# Altium PCB PCI Express_16765X6890_64PIN_Low profile.PCBDOC (part 5 of 5)
Units mm, origin at the board's own origin, x right, y up, seen from the top; angles counter-clockwise.
Board outline 167.65 x 68.9 mm, 6 copper layers (TopLayer, AGround_Layer, InternalPlane1, Power_Layer, Ground_Layer, BottomLayer), stack 1.141 mm thick; 897 components, 648 nets, 2942 pads, 321 vias.
Unrouted connection lines stored in the file: 1996.
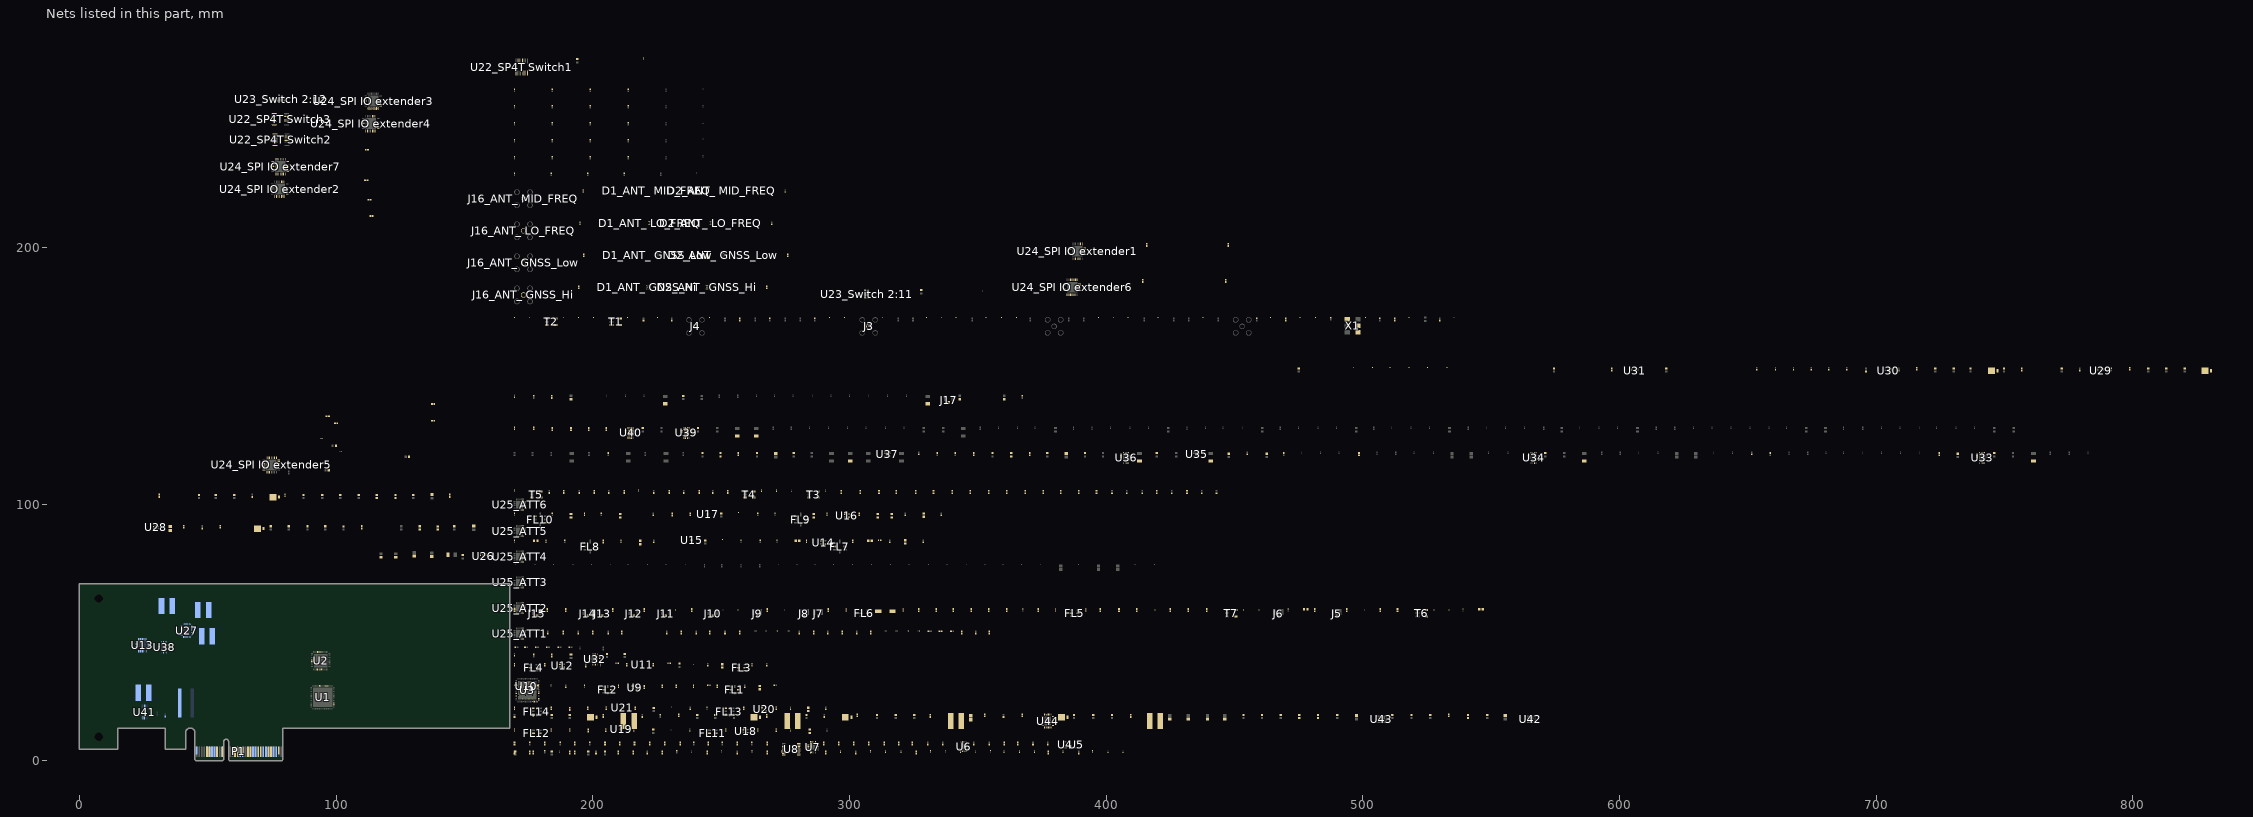
[diagram p6: the nets of this part, all layers, seen from the top]

## Via types
v1: diameter 0.5, hole 0.2, TopLayer to BottomLayer, 309 vias
v2: diameter 0.5, hole 0.2, TopLayer to BottomLayer, tented top, 8 vias
v3: diameter 0.5, hole 0.3, TopLayer to BottomLayer, 4 vias

## Nets (pads, with @x,y where several pads share a name; then routed paths per layer and width w, separated by ;. In a path a pad name is that pad's centre, name@x,y a point inside that pad or via, vN(x,y) a via of type N, cw(c..) or ccw(c..) an arc to the next point about the centre after c; other vN are vias at no path point) (continued)
I2C0_SDA: "R171_SPI IO extender5.1" "U24_SPI IO extender5.9" R42.2 R206.1 U4.2 U7.13 U41.4
I2C1_SCL: "R170_SPI IO extender1.1" "R170_SPI IO extender2.1" "R170_SPI IO extender3.1" "R170_SPI IO extender4.1" "U24_SPI IO extender1.8" "U24_SPI IO extender2.8" "U24_SPI IO extender3.8" "U24_SPI IO extender4.8" R39.2 R40.2 R41.2 U7.3
I2C1_SDA: "R171_SPI IO extender1.1" "R171_SPI IO extender2.1" "R171_SPI IO extender3.1" "R171_SPI IO extender4.1" "U24_SPI IO extender1.9" "U24_SPI IO extender2.9" "U24_SPI IO extender3.9" "U24_SPI IO extender4.9" R36.2 R37.2 R38.2 U7.2
I2C2_SCL: "R170_SPI IO extender6.1" "R170_SPI IO extender7.1" "U24_SPI IO extender6.8" "U24_SPI IO extender7.8" R56.2 R57.2 R58.2 U7.5
I2C2_SDA: "R171_SPI IO extender6.1" "R171_SPI IO extender7.1" "U24_SPI IO extender6.9" "U24_SPI IO extender7.9" R59.2 R60.2 R61.2 U7.4
INA_ALRT: "U24_SPI IO extender5.24" U41.3
JTAG1: P1.B9 U4.9
JTAG2: P1.A5 U5.12
JTAG3: P1.A6 U5.11
JTAG4: P1.A7 U5.10
JTAG5: P1.A8 U5.9
Kom_PG: U32.5
LMK_CLKin0_N: C44.2 U3.32
LMK_CLKin0_P: C45.2 U3.33
LMK_CLKin1_N: C43.2 U3.29
LMK_CLKin1_P: C41.2 U3.30
LMK_CLKsel: "U24_SPI IO extender5.19" U3.34
LMK_OSC_IN_N: C35.1 C37.2 U3.38
LMK_OSC_IN_P: C40.2 C42.2 U3.39
LMK_PG_1.8: "U24_SPI IO extender1.22" U40.5
LMK_PG_3.3: "U24_SPI IO extender1.23" U39.5
LnaInHi: L5.2 U13.19
LnaInLo: L6.2 U13.20
LnaOutHi: C93.1 C94.2 U13.24
LnaOutLo: C96.1 C97.2 U13.23
MaxADC_CLKIN: C62.2 U13.5
MaxCLKOut: R152.1 R160.1 U13.4
MaxCPout: R145.2 TP2.1 U13.1
MaxHIFiltered: C99.2 R146.2 R147.2 R155.1
MaxI0: C90.1 R150.1 R159.1 U13.12
MaxI1: C92.1 R151.1 R161.1 U13.13
MAXIout: "U22_SP4T Switch2.12" C91.2 R142.1
MaxLD: "U24_SPI IO extender7.4" TP1.1 U13.17
MaxLoFiltered: C101.2 R153.2 R154.2 R156.1
MaxQ0: C86.1 R148.1 R158.1 U13.11
MaxQ1: C88.1 R149.1 R157.1 U13.10
MAXQout: "U22_SP4T Switch1.4" C87.2 R140.1
MaxShdn: "U24_SPI IO extender7.3" U13.18
MaxXtal: C60.2 U13.3
MixInHi: C101.1 U13.25
MixInLo: C99.1 U13.26
Net_IOA0: "U24_SPI IO extender7.17" U15.6
Net_IOA1: "U24_SPI IO extender7.18"
Net_IOA3: "U24_SPI IO extender7.20"
Net_IOA4: "U24_SPI IO extender7.21" U15.1
Net_IOA5: "U24_SPI IO extender7.22"
Net_IOB0: "U24_SPI IO extender7.25" U17.6
Net_IOB2: "U24_SPI IO extender7.27" U19.6
Net_IOB3: "U24_SPI IO extender7.28" U10.6
Net_IOB4: "U24_SPI IO extender7.1"
Net_IOB5: "U24_SPI IO extender7.2"
Net_IOC0: "U24_SPI IO extender6.17" U17.1
Net_IOC1: "U24_SPI IO extender6.18" U21.6
Net_IOC2: "U24_SPI IO extender6.19" U11.6
Net_IOC5: "U24_SPI IO extender6.22"
Net_IOC6: "U24_SPI IO extender6.23"
Net_IOD1: "U24_SPI IO extender6.26"
Net_IOD2: "U24_SPI IO extender6.27"
Net_IOD3: "U24_SPI IO extender6.28"
Net_IOD4: "U24_SPI IO extender6.1"
Net_IOD5: "U24_SPI IO extender6.2"
Net_IOD6: "U24_SPI IO extender6.3"
Net_IOD7: "U24_SPI IO extender6.4"
Net_IOE0: "U24_SPI IO extender4.23" R33.1
Net_IOE1: "U24_SPI IO extender4.24" R34.1
Net_IOE2: "U24_SPI IO extender4.3" R35.1
NetC10_1: C10.1 L1.2 R68.1
NetC11_2: C11.2 FL1.2
NetC12_1: C12.1 R69.2
NetC13_1: C13.1 L2.1 R69.1
NetC13_2: C13.2 FL1.6
NetC14_1: C14.1 L1.1 U9.3
NetC15_1: C15.1 FL2.6
NetC15_2: C15.2 U9.1
NetC16_2: C16.2 FL2.2
NetC17_1: C17.1 U10.3
NetC21_1: C21.1 FL3.5
NetC21_2: C21.2 U12.1
NetC22_1: C22.1 L3.2 R70.1
NetC25_1: C25.1 U11.3
NetC25_2: C25.2 FL3.2
NetC26_1: C26.1 L3.1 U12.3
NetC27_2: C27.2 L4.1
NetC28_1: C28.1 FL4.5
NetC29_2: C29.2 R71.1
NetC30_2: C30.2 FL4.2
NetC31_2: C31.2 R72.1
NetC32_2: C32.2 R73.1
NetC33_2: C33.2 U3.5
NetC36_2: C36.2 R76.1
NetC37_1: C37.1 R74.1 R76.2
NetC38_2: C38.2 R75.2 X1.1
NetC39_2: C39.2 R78.1
NetC40_1: C40.1 R78.2 R81.2
NetC60_1: C60.1 T1.1
NetC62_1: C62.1 T2.1
NetC64_1: C64.1 R99.2 R100.1 R103.2
NetC65_1: C65.1 R100.2 R101.1
NetC66_1: C66.1 R104.2 T4.3
NetC66_2: C66.2 R98.1
NetC67_2: C67.2 R102.1 R106.2
NetC68_1: C68.1 R103.1
NetC68_2: C68.2 R107.2
NetC69_2: C69.2 U1.53
NetC70_2: C70.2 U1.54
NetC71_1: C71.1 R104.1 T4.1
NetC71_2: C71.2 R108.1
NetC72_2: C72.2 R107.1 R109.2 R110.1
NetC73_2: C73.2 R110.2 R111.1
NetC74_1: C74.1 U2.15
NetC75_1: C75.1 U2.16
NetC76_2: C76.2 R114.1 R116.2 R118.2
NetC78_2: C78.2 R119.2 R121.1 R123.2
NetC86_2: C86.2 R137.1
NetC87_1: C87.1 T6.3
NetC88_2: C88.2 R139.1
NetC90_2: C90.2 R141.1
NetC91_1: C91.1 T7.3
NetC92_2: C92.2 R144.1
NetC93_2: C93.2 R146.1
NetC94_1: C94.1 FL5.2
NetC95_2: C95.2 R145.1
NetC96_2: C96.2 R153.1
NetC97_1: C97.1 FL6.2
NetC98_2: C98.2 J7.2
NetC100_2: C100.2 J9.2
NetC103_1: C103.1 L7.2 R162.1
NetC104_1: C104.1 L7.1 U14.3
NetC105_1: C105.1 L9.2
NetC105_2: C105.2 U14.1
NetC106_2: C106.2 FL7.2 L8.2
NetC107_2: C107.2 FL7.6 L9.1
NetC108_2: C108.2 R163.2
NetC112_1: C112.1 L10.2
NetC113_1: C113.1 U15.3
NetC113_2: C113.2 L8.1
NetC114_2: C114.2 FL8.2 L10.1
NetC115_1: C115.1 R163.1 U15.5
NetC115_2: C115.2 L11.2
NetC116_2: C116.2 FL8.6 L11.1
NetC118_1: C118.1 L12.2 R164.1
NetC119_1: C119.1 L14.2
NetC119_2: C119.2 U16.1
NetC120_1: C120.1 L12.1 U16.3
NetC121_2: C121.2 FL9.1 L13.2
NetC122_2: C122.2 FL9.5 L14.1
NetC125_1: C125.1 U17.3
NetC125_2: C125.2 L13.1
NetC126_1: C126.1 R165.1
NetC128_2: C128.2 L15.1
NetC129_1: C129.1 C130.2 FL10.5
NetC129_2: C129.2 L16.1 R165.2
NetC131_2: C131.2 FL10.1 L15.2
"NetC132_ANT_ GNSS_Hi_1": "C132_ANT_ GNSS_Hi.1" "J16_ANT_ GNSS_Hi.1"
"NetC132_ANT_ GNSS_Hi_2": "C132_ANT_ GNSS_Hi.2" "D1_ANT_ GNSS_Hi.1"
"NetC132_ANT_ GNSS_Low_1": "C132_ANT_ GNSS_Low.1" "J16_ANT_ GNSS_Low.1"
"NetC132_ANT_ GNSS_Low_2": "C132_ANT_ GNSS_Low.2" "D1_ANT_ GNSS_Low.1"
"NetC132_ANT_ LO_FREQ_1": "C132_ANT_ LO_FREQ.1" "J16_ANT_ LO_FREQ.1"
"NetC132_ANT_ LO_FREQ_2": "C132_ANT_ LO_FREQ.2" "D1_ANT_ LO_FREQ.1"
"NetC132_ANT_ MID_FREQ_1": "C132_ANT_ MID_FREQ.1" "J16_ANT_ MID_FREQ.1"
"NetC132_ANT_ MID_FREQ_2": "C132_ANT_ MID_FREQ.2" "D1_ANT_ MID_FREQ.1"
"NetC133_ANT_ GNSS_Hi_1": "C133_ANT_ GNSS_Hi.1" "D2_ANT_ GNSS_Hi.5"
"NetC133_ANT_ GNSS_Low_1": "C133_ANT_ GNSS_Low.1" "D2_ANT_ GNSS_Low.5"
"NetC133_ANT_ LO_FREQ_1": "C133_ANT_ LO_FREQ.1" "D2_ANT_ LO_FREQ.5"
"NetC133_ANT_ MID_FREQ_1": "C133_ANT_ MID_FREQ.1" "D2_ANT_ MID_FREQ.5"
NetC135_1: C135.1 L17.2 R166.1
NetC136_1: C136.1 L17.1 U18.3
NetC137_1: C137.1 FL11.2
NetC138_1: C138.1 FL11.5
NetC138_2: C138.2 U18.1
NetC141_1: C141.1 U19.3
NetC142_2: C142.2 R167.2
NetC143_2: C143.2 FL12.2
NetC144_1: C144.1 FL12.5
NetC144_2: C144.2 L18.1 R167.1
NetC146_1: C146.1 L19.2 R168.1
NetC147_2: C147.2 FL13.1
NetC148_1: C148.1 FL13.3
NetC148_2: C148.2 U20.1
NetC151_1: C151.1 U21.3
NetC152_1: C152.1 L19.1 U20.3
NetC153_2: C153.2 R169.1
NetC154_2: C154.2 FL14.1
NetC155_1: C155.1 FL14.3
NetC155_2: C155.2 L20.1 R169.2
NetC162_ATT1_2: C162_ATT1.2 U25_ATT1.6 U25_ATT1.7 U25_ATT1.8 U25_ATT1.9
NetC162_ATT2_2: C162_ATT2.2 U25_ATT2.6 U25_ATT2.7 U25_ATT2.8 U25_ATT2.9
NetC162_ATT3_2: C162_ATT3.2 U25_ATT3.6 U25_ATT3.7 U25_ATT3.8 U25_ATT3.9
NetC162_ATT4_2: C162_ATT4.2 U25_ATT4.6 U25_ATT4.7 U25_ATT4.8 U25_ATT4.9
NetC162_ATT5_2: C162_ATT5.2 U25_ATT5.6 U25_ATT5.7 U25_ATT5.8 U25_ATT5.9
NetC162_ATT6_2: C162_ATT6.2 U25_ATT6.6 U25_ATT6.7 U25_ATT6.8 U25_ATT6.9
NetC163_ATT1_2: C163_ATT1.2 U25_ATT1.10
NetC163_ATT2_2: C163_ATT2.2 U25_ATT2.10
NetC163_ATT3_2: C163_ATT3.2 U25_ATT3.10
NetC163_ATT4_2: C163_ATT4.2 U25_ATT4.10
NetC163_ATT5_2: C163_ATT5.2 U25_ATT5.10
NetC163_ATT6_2: C163_ATT6.2 U25_ATT6.10
NetC164_ATT1_2: C164_ATT1.2 U25_ATT1.11
NetC164_ATT2_2: C164_ATT2.2 U25_ATT2.11
NetC164_ATT3_2: C164_ATT3.2 U25_ATT3.11
NetC164_ATT4_2: C164_ATT4.2 U25_ATT4.11
NetC164_ATT5_2: C164_ATT5.2 U25_ATT5.11
NetC164_ATT6_2: C164_ATT6.2 U25_ATT6.11
NetC165_ATT1_2: C165_ATT1.2 U25_ATT1.13
NetC165_ATT2_2: C165_ATT2.2 U25_ATT2.13
NetC165_ATT3_2: C165_ATT3.2 U25_ATT3.13
NetC165_ATT4_2: C165_ATT4.2 U25_ATT4.13
NetC165_ATT5_2: C165_ATT5.2 U25_ATT5.13
NetC165_ATT6_2: C165_ATT6.2 U25_ATT6.13
NetC166_1: C166.1 C167.1 C168.1 C169.1 C180.2 C399.1 C400.1 C401.1 C402.1 C407.2 L23.1 L28.1 R204.2 U27.9 U27.11 U27.26 U27.28 U41.8 U41.9 U44.9 U44.11 U44.26 U44.28
NetC170_1: C170.1 R172.1 R174.2 U26.3
NetC179_1: C179.1 R173.1 R175.1 U27.20
NetC180_1: C180.1 U27.25
NetC181_1: C181.1 R176.1 R178.1 U27.22
NetC186_1: C186.1 R177.1 R179.2 U28.3
NetC189_2: C189.2 U27.12 U27.13 U27.14 U27.15
NetC191_1: C191.1 R180.1 R182.1 U27.21
NetC197_1: C197.1 R183.1 R184.1 U27.19
NetC201_1: C201.1 U30.3 U30.7
  other v2: 704.748,151.999
NetC202_1: C202.1 C203.1 C204.1 C205.1 C206.1 C207.1 C210.2 C211.2 C212.2 C213.2 C214.2 C215.2 FB24.2 U13.2 U13.6 U13.14 U13.22 U13.27 U13.28
NetC209_2: C209.2 FB24.1 U31.1
NetC220_1: C220.1 U32.7
NetC259_2: C259.2 FB25.1 R187.2 U33.10 U33.11 U33.12 U33.13 U33.14
NetC270_1: C270.1 U33.7
NetC279_2: C279.2 FB26.1 R189.2 U34.10 U34.11 U34.12 U34.13 U34.14
NetC293_1: C293.1 U34.7
NetC295_2: C295.2 FB27.1 R192.2 U36.10 U36.11 U36.12 U36.13 U36.14
NetC298_1: C298.1 R191.1 R193.2 U35.3
NetC298_2: C298.2 C299.2 C300.2 C301.2 FB28.1 R191.2 U35.1 U35.2
NetC303_1: C303.1 U36.7
NetC305_1: C305.1 R195.1 R196.2 U37.3
NetC305_2: C305.2 C306.2 C307.2 C308.2 FB31.1 R195.2 U37.1 U37.2
NetC310_1: C310.1 U2.6
NetC311_1: C311.1 J17.2 R197.2 U2.5
NetC329_1: C329.1 U38.7
NetC383_2: C383.2 FB58.1 R200.2 U39.10 U39.11 U39.12 U39.13 U39.14
NetC385_2: C385.2 FB59.1 R201.2 U40.10 U40.11 U40.12 U40.13 U40.14
NetC387_1: C387.1 U39.7
NetC387_2: C387.2 R202.1 U39.6 U39.17
  other v1: 235.949,127.2 237.049,127.2 235.949,128.3 237.049,128.3
NetC388_1: C388.1 U40.7
NetC388_2: C388.2 R203.1 U40.6 U40.17
  other v1: 214.199,127.2 215.299,127.2 214.199,128.3 215.299,128.3
NetC390_1: C390.1 R207.1 R208.2 U42.6
NetC393_2: C393.2 U42.1
NetC395_1: C395.1 R209.1 R210.2 U43.6
NetC398_2: C398.2 U43.1
NetC406_1: C406.1 R211.1 R212.1 U44.20
NetC407_1: C407.1 U44.25
NetC408_1: C408.1 R213.1 R214.1 U44.22
NetC412_2: C412.2 U44.12 U44.13 U44.14 U44.15
NetC413_1: C413.1 R215.1 R217.1 U44.21
NetC417_1: C417.1 R218.1 R219.1 U44.19
"NetD1_ANT_ GNSS_Hi_6": "D1_ANT_ GNSS_Hi.6" "D2_ANT_ GNSS_Hi.2"
"NetD1_ANT_ GNSS_Low_6": "D1_ANT_ GNSS_Low.6" "D2_ANT_ GNSS_Low.2"
"NetD1_ANT_ LO_FREQ_6": "D1_ANT_ LO_FREQ.6" "D2_ANT_ LO_FREQ.2"
"NetD1_ANT_ MID_FREQ_6": "D1_ANT_ MID_FREQ.6" "D2_ANT_ MID_FREQ.2"
NetD3_1: D3.1 L22.1 U27.5
NetD3_2: D3.2 U27.6
NetD4_1: D4.1 L24.1 U27.2
NetD4_2: D4.2 U27.1
NetD5_1: D5.1 L25.1 U27.4
NetD5_2: D5.2 U27.3
NetD6_1: D6.1 L26.1 U27.7
NetD6_2: D6.2 U27.8
NetD7_1: D7.1 L27.1 U44.5
NetD7_2: D7.2 U44.6
NetD8_1: D8.1 L29.1 U44.2
NetD8_2: D8.2 U44.1
NetD9_1: D9.1 L30.1 U44.4
NetD9_2: D9.2 U44.3
NetD10_1: D10.1 L31.1 U44.7
NetD10_2: D10.2 U44.8
NetFB1_1: FB1.1 FB3.1 FB5.1 FB6.1 FB7.1 FB8.1 FB12.1 FB14.1 FB15.1 FB18.1 FB19.1 FB20.1 FB21.1 FB22.1 FB23.1
NetFB2_1: FB2.1 FB4.1
NetFB9_1: FB9.1 FB10.1 FB11.1 FB13.1 FB16.1 FB17.1
NetFL5_5: FL5.5 R147.1
NetFL6_5: FL6.5 R154.1
NetJ5_2: J5.2 R140.2
NetJ6_2: J6.2 R142.2
NetJ8_2: J8.2 R155.2
NetJ10_2: J10.2 R156.2
NetJ11_2: J11.2 R157.2
NetJ12_2: J12.2 R158.2
NetJ13_2: J13.2 R159.2
NetJ14_2: J14.2 R160.2
NetJ15_2: J15.2 R161.2
NetL2_2: L2.2 U10.5
NetL4_2: L4.2 U11.5
NetL16_2: L16.2 U17.5
NetL18_2: L18.2 U19.5
NetL20_2: L20.2 U21.5
NetL23_2: L23.2 U27.24
NetL28_2: L28.2 U44.24
NetR1_1: "U24_SPI IO extender5.13" R1.1 R2.1
NetR3_1: "U24_SPI IO extender5.12" R3.1 R4.1
NetR5_1: "U24_SPI IO extender5.11" R5.1 R6.1
NetR7_1: "U24_SPI IO extender4.13" R7.1 R8.1
NetR9_1: "U24_SPI IO extender4.12" R9.1 R10.1
NetR11_1: "U24_SPI IO extender4.11" R11.1 R12.1
NetR17_1: "U24_SPI IO extender3.13" R17.1 R18.1
NetR19_1: "U24_SPI IO extender3.12" R19.1 R20.1
NetR21_1: "U24_SPI IO extender3.11" R21.1 R22.1
NetR23_1: "U24_SPI IO extender2.13" R23.1 R24.1
NetR25_1: "U24_SPI IO extender2.12" R25.1 R26.1
NetR27_1: "U24_SPI IO extender2.11" R27.1 R28.1
NetR31_1: R31.1 U4.8
NetR32_1: R32.1 U5.8
NetR44_1: "U24_SPI IO extender1.13" R44.1 R45.1
NetR46_1: "U24_SPI IO extender1.12" R46.1 R47.1
NetR48_1: "U24_SPI IO extender1.11" R48.1 R49.1
NetR50_2: R50.2 R51.2 U7.15
NetR52_2: R52.2 R53.2 U7.16
NetR54_2: R54.2 R55.2 U7.11
NetR62_2: R62.2 R63.2 U8.14
NetR64_2: R64.2 R65.2 U8.15
NetR66_2: R66.2 R67.2 U8.16
NetR72_2: R72.2 U3.42
  other v1: 172.459,24.15 173.819,24.15 175.179,24.15 176.539,24.15 171.149,25.46 172.459,25.46 173.819,25.46 175.179,25.46 176.539,25.46 177.849,25.46 171.149,26.82 172.459,26.82 173.819,26.82 175.179,26.82 176.539,26.82 177.849,26.82 171.149,28.18 172.459,28.18 173.819,28.18 175.179,28.18 176.539,28.18 177.849,28.18 171.149,29.54 172.459,29.54 173.819,29.54 175.179,29.54 176.539,29.54 177.849,29.54 172.459,30.85 173.819,30.85 175.179,30.85 176.539,30.85
NetR73_2: R73.2 U3.7
NetR98_2: R98.2 R99.1 R102.2
NetR106_1: R106.1 R108.2 R109.1
NetR112_1: R112.1 R114.2 T3.3
NetR116_1: R116.1 R117.1 T3.1
NetR120_1: R120.1 R121.2 T5.1
NetR123_1: R123.1 R124.1 T5.3
NetR125_1: "U24_SPI IO extender7.13" R125.1 R126.1
NetR127_1: "U24_SPI IO extender7.12" R127.1 R128.1
NetR129_1: "U24_SPI IO extender7.11" R129.1 R130.1
NetR131_1: "U24_SPI IO extender6.13" R131.1 R132.1
NetR133_1: "U24_SPI IO extender6.12" R133.1 R134.1
NetR135_1: "U24_SPI IO extender6.11" R135.1 R136.1
NetR137_2: R137.2 R138.1 T6.4
NetR138_2: R138.2 R139.2 T6.5
NetR141_2: R141.2 R143.1 T7.4
NetR143_2: R143.2 R144.2 T7.5
NetR148_2: R148.2
NetR149_2: R149.2
NetR150_2: R150.2
NetR151_2: R151.2
NetR152_2: R152.2
NetR181_2: R181.2 U27.17
NetR185_1: R185.1 R186.2 U32.9
NetR187_1: R187.1 R188.2 U33.9
NetR189_1: R189.1 R190.2 U34.9
NetR192_1: R192.1 R194.2 U36.9
NetR198_1: R198.1 R199.2 U38.9
NetR200_1: R200.1 R202.2 U39.9
NetR201_1: R201.1 R203.2 U40.9
NetR216_2: R216.2 U44.17
NetT1_3: T1.3 T2.3
NetU8_7: U8.7
NetU8_8: U8.8
"NetU24_SPI IO extender1_3": "U24_SPI IO extender1.3"
"NetU24_SPI IO extender1_4": "U24_SPI IO extender1.4"
"NetU24_SPI IO extender1_15": "U24_SPI IO extender1.15"
"NetU24_SPI IO extender1_16": "U24_SPI IO extender1.16"
"NetU24_SPI IO extender1_24": "U24_SPI IO extender1.24"
"NetU24_SPI IO extender2_3": "U24_SPI IO extender2.3"
"NetU24_SPI IO extender2_4": "U24_SPI IO extender2.4"
"NetU24_SPI IO extender2_15": "U24_SPI IO extender2.15"
"NetU24_SPI IO extender2_16": "U24_SPI IO extender2.16"
"NetU24_SPI IO extender2_23": "U24_SPI IO extender2.23"
"NetU24_SPI IO extender2_24": "U24_SPI IO extender2.24"
"NetU24_SPI IO extender3_4": "U24_SPI IO extender3.4"
"NetU24_SPI IO extender3_15": "U24_SPI IO extender3.15"
"NetU24_SPI IO extender3_16": "U24_SPI IO extender3.16"
"NetU24_SPI IO extender4_4": "U24_SPI IO extender4.4"
"NetU24_SPI IO extender4_15": "U24_SPI IO extender4.15"
"NetU24_SPI IO extender4_16": "U24_SPI IO extender4.16"
"NetU24_SPI IO extender5_1": "U24_SPI IO extender5.1"
"NetU24_SPI IO extender5_2": "U24_SPI IO extender5.2"
"NetU24_SPI IO extender5_3": "U24_SPI IO extender5.3"
"NetU24_SPI IO extender5_4": "U24_SPI IO extender5.4"
"NetU24_SPI IO extender5_15": "U24_SPI IO extender5.15"
"NetU24_SPI IO extender5_16": "U24_SPI IO extender5.16"
"NetU24_SPI IO extender5_23": "U24_SPI IO extender5.23"
"NetU24_SPI IO extender5_25": "U24_SPI IO extender5.25"
"NetU24_SPI IO extender5_26": "U24_SPI IO extender5.26"
"NetU24_SPI IO extender5_27": "U24_SPI IO extender5.27"
"NetU24_SPI IO extender5_28": "U24_SPI IO extender5.28"
"NetU24_SPI IO extender6_15": "U24_SPI IO extender6.15"
"NetU24_SPI IO extender6_16": "U24_SPI IO extender6.16"
"NetU24_SPI IO extender7_15": "U24_SPI IO extender7.15"
"NetU24_SPI IO extender7_16": "U24_SPI IO extender7.16"
O1_N: C47.2 C70.1 R105.2
O1_P: C46.2 C69.1 R105.1
O2_N: C49.2 U1.59
O2_P: C48.2 U1.58
O3_N: C59.2 T1.5
O3_P: C58.2 T1.4
O5_N: C63.2 T2.5
O5_P: C61.2 T2.4
O6_N: C51.2 P1.B15
O6_P: C50.2 P1.B14
O8_N: C57.1 R95.1 R96.1 R97.1
O8_P: C56.1 R93.2 R94.2 R95.2
O8P_N: C57.2 J4.1
O8P_P: C56.2 J3.1
O9_N: C53.2 C74.2 R113.1
O9_P: C52.2 C75.2 R113.2
O10_N: C55.2 U2.19
O10_P: C54.2 U2.18
PCA_VCC: "R170_SPI IO extender1.2" "R170_SPI IO extender2.2" "R170_SPI IO extender3.2" "R170_SPI IO extender4.2" "R171_SPI IO extender1.2" "R171_SPI IO extender2.2" "R171_SPI IO extender3.2" "R171_SPI IO extender4.2" "U24_SPI IO extender1.5" "U24_SPI IO extender2.5" "U24_SPI IO extender3.5" "U24_SPI IO extender4.5" C217.2 C218.2 R8.2 R10.2 R12.2 R18.2 R20.2 R22.2 R24.2 R26.2 R28.2 R31.2 R32.2 R36.1 R37.1 R38.1 R39.1 R40.1 R41.1 R42.1 R43.1 R45.2 R47.2 R49.2 R51.1 R53.1 R55.1 R56.1 R57.1 R58.1 R59.1 R60.1 R61.1 R62.1 R64.1 R66.1 R185.2 U4.16 U5.16 U6.14 U8.12 U32.10 U32.11 U32.12 U32.13 U32.14
PER0_N: C3.2 P1.A17
PER0_P: C4.2 P1.A16
PER1_N: C1.2 P1.A22
PER1_P: C2.2 P1.A21
PER2_N: C6.2 P1.A26
PER2_P: C5.2 P1.A25
PER3_N: C8.2 P1.A30
PER3_P: C7.2 P1.A29
PERST#: "U24_SPI IO extender1.14" "U24_SPI IO extender2.14" "U24_SPI IO extender3.14" "U24_SPI IO extender4.14" "U24_SPI IO extender5.14" P1.A11 U7.1 U8.3
PET1_N: P1.B20
PET1_P: P1.B19
PET2_N: P1.B24
PET2_P: P1.B23
PET3_N: P1.B28
PET3_P: P1.B27
PG_LTC2122: "U24_SPI IO extender5.18" U38.5
PRSNT1#: P1.A1
PRSNT2#: P1.B17 P1.B31
Reset: "U24_SPI IO extender5.20" "U24_SPI IO extender6.14" "U24_SPI IO extender7.14"
"RF1_SP4T Switch1": "U22_SP4T Switch1.14" C104.2
"RF1_SP4T Switch2": "U22_SP4T Switch2.14"
"RF1_SP4T Switch3": "U22_SP4T Switch3.14" C142.1 C143.1
"RF1ADG_Switch 2:11": "U23_Switch 2:11.8" C26.2
"RF1ADG_Switch 2:12": "U23_Switch 2:12.8" C29.1 C30.1
"RF2_SP4T Switch1": "U22_SP4T Switch1.12" C120.2
"RF2_SP4T Switch3": "U22_SP4T Switch3.12" C11.1 C12.2
"RF2ADG_Switch 2:11": "U23_Switch 2:11.5" C14.2
"RF2ADG_Switch 2:12": "U23_Switch 2:12.5" C85.2 L5.1
"RF3_SP4T Switch1": "U22_SP4T Switch1.6" C136.2
"RF3_SP4T Switch2": "U22_SP4T Switch2.6"
"RF3_SP4T Switch3": "U22_SP4T Switch3.6" C153.1 C154.1
"RF4_SP4T Switch2": "U22_SP4T Switch2.4" C152.2
"RF4_SP4T Switch3": "U22_SP4T Switch3.4" C89.2 L6.1
"RFC_SP4T Switch1": "U22_SP4T Switch1.1" C79.1
"RFC_SP4T Switch2": "U22_SP4T Switch2.1" C81.2
"RFC_SP4T Switch3": "C133_ANT_ GNSS_Low.2" "U22_SP4T Switch3.1"
"RFCADG_Switch 2:11": "U23_Switch 2:11.4" C82.2
"RFCADG_Switch 2:12": "C133_ANT_ GNSS_Hi.2" "U23_Switch 2:12.4"
SC18_INT: U5.4 U8.9
SCLK: U1.36 U2.45 U3.13 U5.1 U8.11 U13.8
SDA: U1.35 U2.44 U3.11 U5.2 U6.5 U6.12 U8.6 U13.7
SMCLK: P1.B5 R29.1 U4.12
SMDAT: P1.B6 R30.1 U4.11
SPI_MISO: U2.43 U5.3 U6.3 U6.6 U6.8 U6.11 U8.5
TorRF_50Ohm_20: C79.2 T3.5
TorRF_50Ohm_21: C80.1 T3.4
TorRF_50Ohm_22: C82.1 T4.5
TorRF_50Ohm_23: C83.2 T4.4
TorRF_50Ohm_24: C81.1 T5.5
TorRF_50Ohm_25: C84.2 T5.4
V1_1.8V: C181.2 C182.2 C183.2 C184.2 C185.2 C292.2 C294.2 L24.2 R176.2 U34.1 U34.2 U34.3 U34.15 U34.16 U36.1 U36.2 U36.3 U36.15 U36.16
V1_2.5V: C197.2 C198.2 C199.2 C200.2 C328.1 L26.2 R183.2 U38.1 U38.2 U38.3 U38.15 U38.16
V1_2.8V: C175.2 C176.2 C177.2 C179.2 C219.2 C261.2 L22.2 R173.2 U32.1 U32.2 U32.3 U32.4 U32.15 U32.16 U33.1 U33.2 U33.3 U33.15 U33.16
V1_3.9V: C178.2 C190.2 C191.2 C192.2 C193.2 C194.2 C196.2 C208.2 C216.2 L25.2 R180.2 U26.7 U26.8 U28.7 U28.8 U29.6 U30.6 U31.6
V2_2.5V: C297.2 C304.2 C408.2 C409.2 C410.2 C411.2 L29.2 R213.2 U35.7 U35.8 U37.7 U37.8
V2_3.6V: C389.2 C403.2 C404.2 C405.2 C406.2 C413.2 C414.2 C415.2 C416.2 L27.2 L30.2 R211.2 R215.2 U39.1 U39.2 U39.3 U39.15 U39.16 U40.1 U40.2 U40.3 U40.15 U40.16 U42.4
V2_5.5V: C394.2 C417.2 C418.2 C419.2 L31.2 R218.2 U43.4
"Vcc5VHMC_SP4T Switch1": "C156_SP4T Switch1.2" "C157_SP4T Switch1.2" "U22_SP4T Switch1.8" FB14.2
"Vcc5VHMC_SP4T Switch2": "C156_SP4T Switch2.2" "C157_SP4T Switch2.2" "U22_SP4T Switch2.8" FB15.2
"Vcc5VHMC_SP4T Switch3": "C156_SP4T Switch3.2" "C157_SP4T Switch3.2" "U22_SP4T Switch3.8" FB12.2
Vcc_2.5V_SW_1: "C158_Switch 2:11.2" "C158_Switch 2:12.2" "C159_Switch 2:11.2" "C159_Switch 2:12.2" "U23_Switch 2:11.1" "U23_Switch 2:12.1"
Vcc_2.8V: C109.2 C110.2 C123.2 C124.2 FB2.2 U15.2 U17.2
Vcc_2.8V_Exdr_1: "R170_SPI IO extender7.2" "R171_SPI IO extender7.2" "U24_SPI IO extender7.5" FB16.2 R126.2 R128.2 R130.2
Vcc_2.8V_Exdr_2: "R170_SPI IO extender6.2" "R171_SPI IO extender6.2" "U24_SPI IO extender6.5" FB17.2 R132.2 R134.2 R136.2
Vcc_2.8V_LNA_1: C23.2 C24.2 FB9.2 U11.2
Vcc_2.8V_LNA_2: C139.2 C140.2 FB10.2 U19.2
Vcc_2.8V_LNA_3: C18.2 C19.2 FB11.2 U10.2
Vcc_2.8V_LNA_4: C149.2 C150.2 FB13.2 U21.2
Vcc_3.3V_Tor2: FB4.2
Vcc_5V_AMP_1: C102.1 FB18.2 R162.2
Vcc_5V_AMP_2: C117.1 FB19.2 R164.2
Vcc_5V_AMP_3: C134.1 FB20.2 R166.2
Vcc_5V_AMP_4: C9.1 FB21.2 R68.2
Vcc_5V_AMP_5: C145.1 FB22.2 R168.2
Vcc_5V_AMP_6: C20.1 FB23.2 R70.2
Vcc_2122_1.8V: C321.2 FB42.1 FB43.1 R198.2 U38.10 U38.11 U38.12 U38.13 U38.14
Vcm_2122: C77.2 R118.1 R119.1 U2.7
VCXO_OUT_N: C36.1 X1.5
VCXO_OUT_P: C39.1 X1.4
Vsup_2.5V: C195.2 U29.1
Vsup_2.8V: C390.2 C391.2 C392.2 R207.2 U42.5
Vsup_3.3V: C170.2 C171.2 C172.2 C173.2 C186.2 C187.2 C188.2 L21.1 R172.2 R177.2 U26.1 U26.2 U28.1 U28.2
Vsup_5V: C395.2 C396.2 C397.2 R209.2 U43.5
WAKE#: P1.B11 U4.10
pads on no net: "D1_ANT_ GNSS_Hi.3" "D1_ANT_ GNSS_Hi.4" "D1_ANT_ GNSS_Hi.5" "D1_ANT_ GNSS_Hi.7" "D1_ANT_ GNSS_Low.3" "D1_ANT_ GNSS_Low.4" "D1_ANT_ GNSS_Low.5" "D1_ANT_ GNSS_Low.7" "D1_ANT_ LO_FREQ.3" "D1_ANT_ LO_FREQ.4" "D1_ANT_ LO_FREQ.5" "D1_ANT_ LO_FREQ.7" "D1_ANT_ MID_FREQ.3" "D1_ANT_ MID_FREQ.4" "D1_ANT_ MID_FREQ.5" "D1_ANT_ MID_FREQ.7" "D2_ANT_ GNSS_Hi.1" "D2_ANT_ GNSS_Hi.3" "D2_ANT_ GNSS_Hi.4" "D2_ANT_ GNSS_Hi.6" "D2_ANT_ GNSS_Low.1" "D2_ANT_ GNSS_Low.3" "D2_ANT_ GNSS_Low.4" "D2_ANT_ GNSS_Low.6" "D2_ANT_ LO_FREQ.1" "D2_ANT_ LO_FREQ.3" "D2_ANT_ LO_FREQ.4" "D2_ANT_ LO_FREQ.6" "D2_ANT_ MID_FREQ.1" "D2_ANT_ MID_FREQ.3" "D2_ANT_ MID_FREQ.4" "D2_ANT_ MID_FREQ.6" "U22_SP4T Switch1.3" "U22_SP4T Switch1.5" "U22_SP4T Switch1.7" "U22_SP4T Switch1.11" "U22_SP4T Switch1.13" "U22_SP4T Switch1.15" "U22_SP4T Switch1.16" "U22_SP4T Switch2.3" "U22_SP4T Switch2.5" "U22_SP4T Switch2.7" "U22_SP4T Switch2.11" "U22_SP4T Switch2.13" "U22_SP4T Switch2.15" "U22_SP4T Switch2.16" "U22_SP4T Switch3.3" "U22_SP4T Switch3.5" "U22_SP4T Switch3.7" "U22_SP4T Switch3.11" "U22_SP4T Switch3.13" "U22_SP4T Switch3.15" "U22_SP4T Switch3.16" "U23_Switch 2:11.6" "U23_Switch 2:11.7" "U23_Switch 2:11.9" "U23_Switch 2:12.6" "U23_Switch 2:12.7" "U23_Switch 2:12.9" "U24_SPI IO extender1.7" "U24_SPI IO extender1.10" "U24_SPI IO extender2.7" "U24_SPI IO extender2.10" "U24_SPI IO extender3.7" "U24_SPI IO extender3.10" "U24_SPI IO extender4.7" "U24_SPI IO extender4.10" "U24_SPI IO extender5.7" "U24_SPI IO extender5.10" "U24_SPI IO extender6.7" "U24_SPI IO extender6.10" "U24_SPI IO extender7.7" "U24_SPI IO extender7.10" Conn1.1 Conn1.2 Conn2.1 Conn2.2 FL1.3 FL1.4 FL1.5 FL1.7 FL1.8 FL2.3 FL2.4 FL2.5 FL2.7 FL2.8 FL3.3 FL3.4 FL3.6 FL4.3 FL4.4 FL4.6 FL5.3 FL5.4 FL5.6 FL6.3 FL6.4 FL6.6 FL7.3 FL7.4 FL7.5 FL7.7 FL7.8 FL8.3 FL8.4 FL8.5 FL8.7 FL8.8 FL9.3 FL9.4 FL9.6 FL9.7 FL9.8 FL10.3 FL10.4 FL10.6 FL10.7 FL10.8 FL11.3 FL11.4 FL11.6 FL12.3 FL12.4 FL12.6 FL13.4 FL13.5 FL13.6 FL13.7 FL13.8 FL14.4 FL14.5 FL14.6 FL14.7 FL14.8 J1.2 J1.3 J1.4 J1.5 J2.2 J2.3 J2.4 J2.5 P1.A19 P1.A32 P1.B12 P1.B30 T1.2 T2.2 T3.2 T4.2 T5.2 T6.2 T7.2 U1.2 U1.7 U1.8 U1.9 U1.10 U1.11 U1.20 U1.21 U1.26 U1.27 U1.28 U1.29 U1.30 U1.31 U1.32 U1.33 U1.34 U1.38 U1.39 U1.40 U1.41 U1.42 U1.43 U1.44 U1.45 U1.46 U1.47 U1.48 U1.49 U1.50 U1.51 U1.52 U1.55 U1.60 U1.61 U1.62 U1.63 U1.64 U2.8 U2.11 U2.12 U2.13 U2.14 U2.17 U2.20 U2.21 U2.22 U2.23 U2.24 U2.26 U2.27 U2.28 U2.33 U2.34 U2.35 U2.36 U2.37 U2.38 U2.39 U2.40 U2.41 U2.42 U2.47 U2.48 U2.49 U3.1 U3.2 U3.3 U3.14 U3.23 U3.24 U3.35 U3.36 U3.47 U3.48 U3.56 U3.58 U3.59 U3.60 U3.61 U3.62 U3.63 U3.64 U3.65 U4.5 U4.7 U4.14 U4.15 U5.5 U5.7 U5.14 U5.15 U6.9 U6.10 U7.7 U7.8 U7.9 U7.10 U7.14 U10.4 U11.4 U13.21 U19.4 U21.4 U25_ATT1.3 U25_ATT1.5 U25_ATT1.12 U25_ATT1.14 U25_ATT1.16 U25_ATT1.17 U25_ATT1.18 U25_ATT2.3 U25_ATT2.5 U25_ATT2.12 U25_ATT2.14 U25_ATT2.16 U25_ATT2.17 U25_ATT2.18 U25_ATT3.3 U25_ATT3.5 U25_ATT3.12 U25_ATT3.14 U25_ATT3.16 U25_ATT3.17 U25_ATT3.18 U25_ATT4.3 U25_ATT4.5 U25_ATT4.12 U25_ATT4.14 U25_ATT4.16 U25_ATT4.17 U25_ATT4.18 U25_ATT5.3 U25_ATT5.5 U25_ATT5.12 U25_ATT5.14 U25_ATT5.16 U25_ATT5.17 U25_ATT5.18 U25_ATT6.3 U25_ATT6.5 U25_ATT6.12 U25_ATT6.14 U25_ATT6.16 U25_ATT6.17 U25_ATT6.18 U26.6 U26.9 U28.6 U28.9 U29.2 U29.5 U30.2 U30.5 U31.2 U31.5 U32.8 U33.8 U34.8 U35.6 U35.9 U36.8 U37.6 U37.9 U38.8 U39.8 U40.8 U41.1 U41.2 U42.2 U42.7 U43.2 U43.7 X1.2
copper on no net:
  other v1: 91.8,36.8 92.9,36.8 94,36.8 95.1,36.8 96.2,36.8 91.8,37.9 92.9,37.9 94,37.9 95.1,37.9 96.2,37.9 91.8,39 92.9,39 94,39 95.1,39 96.2,39 91.8,40.1 92.9,40.1 94,40.1 95.1,40.1 96.2,40.1 91.8,41.2 92.9,41.2 94,41.2 95.1,41.2 96.2,41.2 157.324,79.249 157.324,80.249 29.825,90.499 29.825,91.499 314.749,119 435.249,119 314.749,120 435.249,120 76.6,229.85 77.7,229.85 78.8,229.85 79.9,229.85 76.6,230.95 77.7,230.95 78.8,230.95 79.9,230.95 76.6,232.05 77.7,232.05 78.8,232.05 79.9,232.05 76.6,233.15 77.7,233.15 78.8,233.15 79.9,233.15 111.85,246.6 112.95,246.6 114.05,246.6 115.15,246.6 111.85,247.7 112.95,247.7 114.05,247.7 115.15,247.7 111.85,248.8 112.95,248.8 114.05,248.8 115.15,248.8 111.85,249.9 112.95,249.9 114.05,249.9 115.15,249.9 112.787,255.35 113.887,255.35 114.987,255.35 116.087,255.35 112.787,256.45 113.887,256.45 114.987,256.45 116.087,256.45 112.787,257.55 113.887,257.55 114.987,257.55 116.087,257.55 112.787,258.65 113.887,258.65 114.987,258.65 116.087,258.65

## Polygon pours and split planes (outlines as drawn)
no net on InternalPlane1 (split plane): 167.267,13.133 79.3,13.133 79.225,13.125 79.153,13.104 79.087,13.068 79.029,13.021 78.982,12.963 78.946,12.897 78.925,12.825 78.917,12.75 78.917,0.659 78.641,0.383 58.759,0.383 58.483,0.659 58.483,7.45 58.475,7.599 58.45,7.747 58.408,7.89 58.351,8.028 58.279,8.159 58.192,8.281 58.093,8.393 57.981,8.492 57.859,8.579 57.728,8.651 57.59,8.708 57.447,8.75 57.299,8.775 57.15,8.783 57.001,8.775 56.853,8.75 56.71,8.708 56.572,8.651 56.441,8.579 56.319,8.492 56.207,8.393 56.108,8.281 56.021,8.159 55.949,8.028 55.892,7.89 55.85,7.747 55.825,7.599 55.817,7.45 55.817,0.659 55.541,0.383 45.659,0.383 45.383,0.659 45.383,10.925 45.375,11.117 45.35,11.308 45.308,11.496 45.25,11.68 45.176,11.858 45.087,12.029 44.984,12.192 44.867,12.344 44.736,12.486 44.594,12.617 44.442,12.734 44.279,12.837 44.108,12.926 43.93,13 43.746,13.058 43.558,13.1 43.367,13.125 43.175,13.133 42.983,13.125 42.792,13.1 42.604,13.058 42.42,13 42.242,12.926 42.071,12.837 41.908,12.734 41.756,12.617 41.614,12.486 41.483,12.344 41.366,12.192 41.263,12.029 41.174,11.858 41.1,11.68 41.042,11.496 41,11.308 40.975,11.117 40.967,10.925 40.967,4.883 33.733,4.883 33.733,12.75 33.725,12.825 33.704,12.897 33.668,12.963 33.621,13.021 33.563,13.068 33.497,13.104 33.425,13.125 33.35,13.133 15,13.133 14.925,13.125 14.853,13.104 14.787,13.068 14.729,13.021 14.682,12.963 14.646,12.897 14.625,12.825 14.617,12.75 14.617,4.883 0.383,4.883 0.383,68.517 167.267,68.517
no net on Ground_Layer (split plane): 167.267,13.133 79.3,13.133 79.225,13.125 79.153,13.104 79.087,13.068 79.029,13.021 78.982,12.963 78.946,12.897 78.925,12.825 78.917,12.75 78.917,0.659 78.641,0.383 58.759,0.383 58.483,0.659 58.483,7.45 58.475,7.599 58.45,7.747 58.408,7.89 58.351,8.028 58.279,8.159 58.192,8.281 58.093,8.393 57.981,8.492 57.859,8.579 57.728,8.651 57.59,8.708 57.447,8.75 57.299,8.775 57.15,8.783 57.001,8.775 56.853,8.75 56.71,8.708 56.572,8.651 56.441,8.579 56.319,8.492 56.207,8.393 56.108,8.281 56.021,8.159 55.949,8.028 55.892,7.89 55.85,7.747 55.825,7.599 55.817,7.45 55.817,0.659 55.541,0.383 45.659,0.383 45.383,0.659 45.383,10.925 45.375,11.117 45.35,11.308 45.308,11.496 45.25,11.68 45.176,11.858 45.087,12.029 44.984,12.192 44.867,12.344 44.736,12.486 44.594,12.617 44.442,12.734 44.279,12.837 44.108,12.926 43.93,13 43.746,13.058 43.558,13.1 43.367,13.125 43.175,13.133 42.983,13.125 42.792,13.1 42.604,13.058 42.42,13 42.242,12.926 42.071,12.837 41.908,12.734 41.756,12.617 41.614,12.486 41.483,12.344 41.366,12.192 41.263,12.029 41.174,11.858 41.1,11.68 41.042,11.496 41,11.308 40.975,11.117 40.967,10.925 40.967,4.883 33.733,4.883 33.733,12.75 33.725,12.825 33.704,12.897 33.668,12.963 33.621,13.021 33.563,13.068 33.497,13.104 33.425,13.125 33.35,13.133 15,13.133 14.925,13.125 14.853,13.104 14.787,13.068 14.729,13.021 14.682,12.963 14.646,12.897 14.625,12.825 14.617,12.75 14.617,4.883 0.383,4.883 0.383,68.517 167.267,68.517

## Keep-outs
TopLayer:
  rectangle: 79.3,12.75 167.65,13.75
  rectangle: 0,58.5 12.7,68.9
  rectangle: 12.7,67.9 166.65,68.9
  rectangle: 166.65,13.75 167.65,68.9
  region: 0,4.45 15,4.45 ccw(c15,4.5) 15.05,4.5 15.05,12.7 33.3,12.7 33.3,7.95 ccw(c33.35,7.95) 33.35,7.9 41.35,7.9 ccw(c41.35,7.95) 41.4,7.95 ccw(c41.35,7.95) 41.4,7.951 41.4,10.925 cw(c43.175,10.925) 44.95,10.925 ccw(c45,10.925) 45.05,10.925 45.05,13.75 ccw(c45,13.75) 45,13.8 0,13.8 ccw(c0,13.75) -0.05,13.75 -0.05,4.5 ccw(c0,4.5)
BottomLayer:
  rectangle: 79.3,12.75 167.65,13.75
  rectangle: 166.65,13.75 167.65,68.9
  rectangle: 12.7,67.9 166.65,68.9
  rectangle: 0,58.5 12.7,68.9
  rectangle: 0,13.75 1,58.5
  region: 0,4.45 15,4.45 ccw(c15,4.5) 15.05,4.5 15.05,12.7 33.3,12.7 33.3,7.95 ccw(c33.35,7.95) 33.35,7.9 41.35,7.9 ccw(c41.35,7.95) 41.4,7.95 ccw(c41.35,7.95) 41.4,7.951 41.4,10.925 cw(c43.175,10.925) 44.95,10.925 ccw(c45,10.925) 45.05,10.925 45.05,13.75 ccw(c45,13.75) 45,13.8 0,13.8 ccw(c0,13.75) -0.05,13.75 -0.05,4.5 ccw(c0,4.5)
TopSolder:
  rectangle: 33.35,4.5 41.35,7.95
BottomSolder:
  rectangle: 33.35,4.5 41.35,7.95
KeepOutLayer:
  rectangle: 33.35,4.5 41.35,7.95

## Silkscreen, mask and mechanical layers (free items; w line width, h text height)
PCI-SIG Outline:
  the board outline again, w0.1
PCI-SIG Notes:
  text "- Nominal values used, dimensions in mm" at 83.75,9.5 h1.52
  text "- Component height rule and clearance rule derived from PCI_Express_CEM_r2.0.pdf, Page 84." at 83.75,7.5 h1.52
  text "- The mounting holes and keep-out areas around them are only required when the I/O bracket is mounted on the card directly" at 83.75,5.5 h1.52
  text "- Stackup is not specified in PCI_Express_CEM_r2.0.pdf, nor implemented in this template." at 83.75,3.5 h1.52
Mechanical7:
  lines w0.1: 0,4.5 0,13.75 45,13.75 45,10.925 ccw(c43.175,10.925) 41.35,10.925 41.35,7.95 33.35,7.95 33.35,12.75 15,12.75 15,4.5 0,4.5
DrillDrawing:
  text ".LEGEND" at 165.001,84.977 h1
  text "Drilling Details." at 165.001,83.148 h1

## Dimensions
0,68.9 to 167.65,68.9 on PCI-SIG Dimensions
0,4.5 to 0,68.9 on PCI-SIG Dimensions
0,0 to 0,68.9 on PCI-SIG Dimensions